# Altium PCB Sound_Sensor_PoE_v1.0.PcbDoc (part 4 of 4)
Units mil, origin at the board's own origin, x right, y up, seen from the top; angles counter-clockwise.
Board outline 3543.31 x 3543.31 mil, 2 copper layers (Top Layer, Bottom Layer), stack 57 mil thick; 149 components, 113 nets, 536 pads, 184 vias.
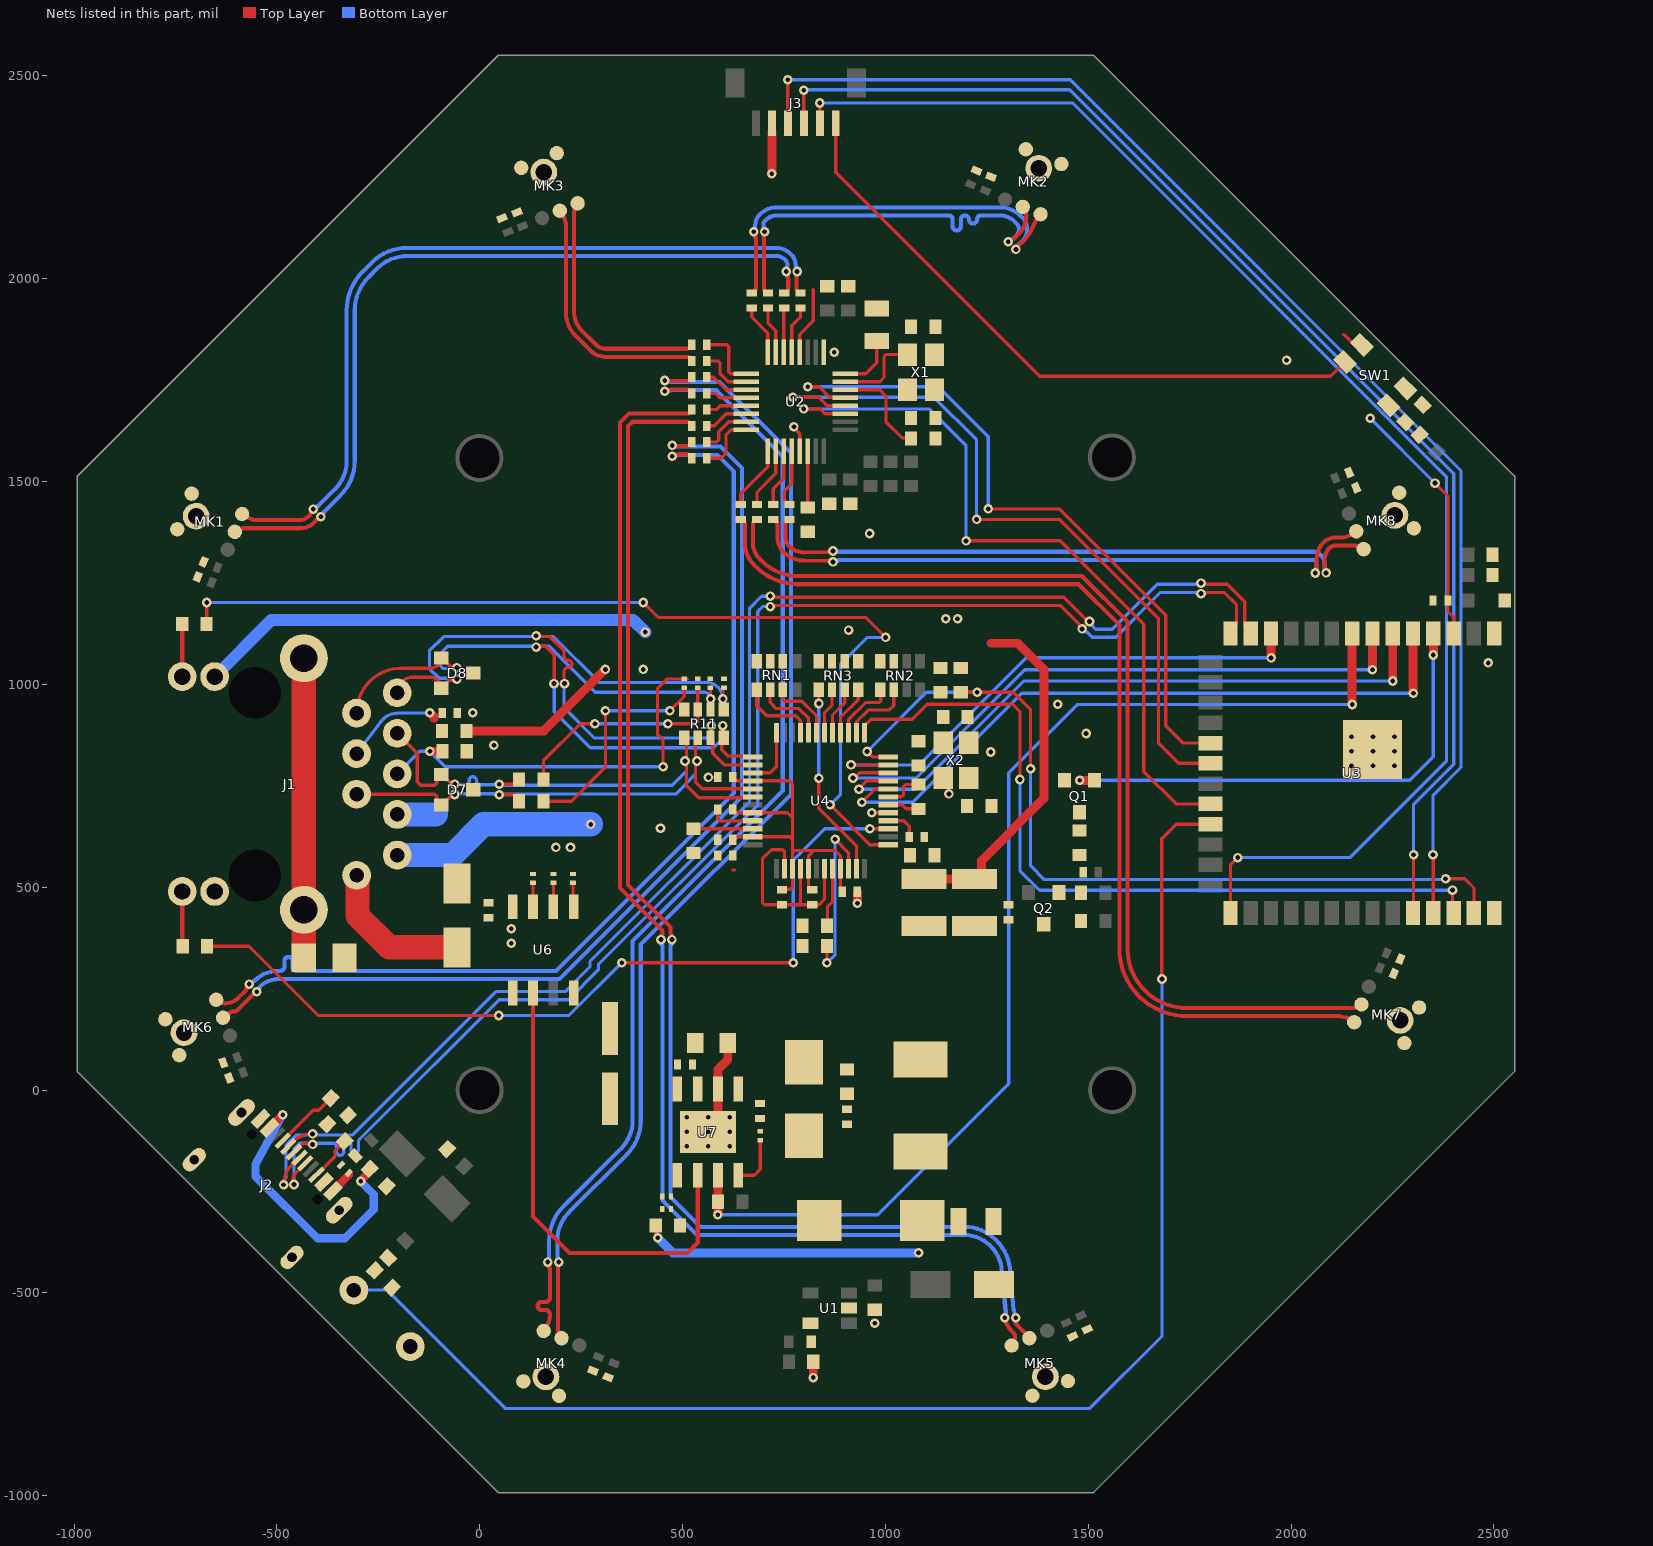
[diagram p2: the nets of this part, all layers, seen from the top]

## Via types
v1: diameter 23.62, hole 11.81, Top Layer to Bottom Layer, tented both sides, 155 vias
v2: diameter 23.62, hole 11.81, Top Layer to Bottom Layer, 29 vias

## Nets (pads, with @x,y where several pads share a name; then routed paths per layer and width w, separated by ;. In a path a pad name is that pad's centre, name@x,y a point inside that pad or via, vN(x,y) a via of type N, cw(c..) or ccw(c..) an arc to the next point about the centre after c; other vN are vias at no path point) (continued)
ACTLED: R14.2 U4.27 | length 2096.3
  Top Layer w8: R14.2@-671.89,354.86 -568.63,354.86 -397.77,184 v1(47,184) ; v1@342.65,314 v1(773,314) ; v1(961.99,644.27) U4.27@1007.48,644.27
  Bottom Layer w8: v1(47,184) 220,184 v1(350,314) ; v1(773,314) 773,567 850.27,644.27 v1(961.99,644.27)
ADC1_XIN: R6.1 U2.22 | length 249.3
  Top Layer w8: U2.22@901.19,1726.33 986,1726.33 1001.28,1711.05 1001.28,1647.46 1041.28,1607.46 1062.62,1607.46 R6.1@1063.59,1606.49
ADC1_XOUT#: C40.2 U2.23 X1.3 | length 211.1
  Top Layer w8: U2.23@901.19,1746.02 986,1746.02 996.59,1756.61 996.59,1808.42 1001.28,1813.1 X1.3@1054.18,1813.1
CAP: C42.2 U2.24 | length 142.2
  Top Layer w8: U2.24@901.19,1765.7 951.32,1765.7 978.59,1792.97 C42.2@978.59,1846.49
CT_R: C64.2 J1.5 R24.1 R25.1 | length 1007.1
  Top Layer w8: v1(452,797) 452,863.15 438.19,876.96 438.19,989.5 462.39,1013.7 R24.1@504.35,1013.7 511.64,1013.7
  Top Layer w22: v1(-122.74,835.38) C64.2@-91.77,835.38
  Bottom Layer w8: J1.5@-203.34,779.49 -147.45,835.38 -123,835.38 v1(-122.74,835.38) -84.35,797 v1(452,797)
CT_T: C63.2 J1.4 R17.1 | length 259.5
  Top Layer w22: v1@-123,929.49 -121.28,929.49 -112.99,921.2 -112.99,916.99
  Bottom Layer w8: J1.4@-303.34,845.15 J1.4@-303.34,829.49 -242.72,909.37 cw(c-203.34,879.49) -204.3,928.91 v1(-123,930.49)
DCDC_POK: R47.1 U3.8 U7.7 | length 2805.8
  Top Layer w22: v1(587,-307) 587.26,-306.74 587.26,-276.02 R47.1@588,-275.28 ; R47.1@587.52,-275.28 U7.7@587.52,-209.58 ; v1(2150.7,950.49) U3.8@2150.7,1125.17
  Bottom Layer w8: v1(587,-307) 981,-307 1304,16 1304,782 1472.49,950.49 v1(2150.7,950.49)
"DEBUG SIG.ENABLE": C48.2 C53.1 J3.6 R7.2 SW1.1 U3.3 | length 2215.5
  Top Layer w8: J3.6@877.7,2382.99 877.7,2262.3 1380.6,1759.4 2097.22,1759.4 SW1.1@2133.02,1795.2 ; v1(2354.92,1496.4) 2386.92,1464.4 C48.2@2386.92,1206.99 2386.92,1179.08 2400.7,1165.3 U3.3@2400.7,1125.17
  Bottom Layer w8: v1(2195,1656.31) v1(2354.92,1496.4)
"DEBUG SIG.IO_0": J3.5 U3.27 | length 3435.1
  Top Layer w8: J3.5@838.33,2382.99 v1(838.33,2433.33) ; U3.27@1850.7,436.2 1850.7,555.49 v1(1868.42,573.2)
  Bottom Layer w8: v1(838.33,2433.33) 1461.67,2433.33 2383,1512 2383,811 2145.2,573.2 v1(1868.42,573.2)
"DEBUG SIG.RX": J3.4 U3.36 | length 3201.1
  Top Layer w8: J3.4@798.96,2382.99 v1(798.96,2464.6) ; U3.36@2300.7,436.2 2302,437.5 v1(2302,580)
  Bottom Layer w8: v1(798.96,2464.6) 800.4,2466.04 1454.42,2466.04 2401,1519.46 2401,803.54 2302,704.54 v1(2302,580)
"DEBUG SIG.TX": J3.3 U3.37 | length 3285.5
  Top Layer w8: J3.3@759.59,2382.99 v1(759.59,2490.41) ; v1(2350,580) 2350.7,579.3 U3.37@2350.7,436.2
  Bottom Layer w8: v1(759.59,2490.41) 1455.5,2490.41 2419,1526.91 2419,796.09 2350,727.09 v1(2350,580)
FB: C72.1 R45.1 R46.2 U7.5
GND: C1.2 C2.2 C3.2 C4.2 C5.2 C6.2 C7.2 C8.2 C9.2 C10.2 C11.2 C12.2 C13.2 C14.2 C15.2 C16.2 C17.2 C18.2 C35.2 C36.2 C37.2 C38.2 C39.1 C40.1 C41.2 C42.1 C43.2 C44.2 C45.1 C46.2 C47.2 C48.1 C50.1 C51.1 C52.1 C53.2 C54.1 C55.1 C56.1 C57.1 C58.1 C59.1 C60.1 C63.1 C64.1 C65.1 C66.1 C67.1 C68.1 C70.2 C73.2 C74.1 C75.1 D1.1 D2.2 D4.1 D7.3 D8.3 J1.7 J2.A1/B12 J2.B1/A12 J2.S1 J2.S2 J2.S3 J2.S4 J3.2 MK1.2 MK1.3 MK1.4 MK2.2 MK2.3 MK2.4 MK3.2 MK3.3 MK3.4 MK4.2 MK4.3 MK4.4 MK5.2 MK5.3 MK5.4 MK6.2 MK6.3 MK6.4 MK7.2 MK7.3 MK7.4 MK8.2 MK8.3 MK8.4 Q1.2 R1.1 R2.1 R37.1 R40.1 R46.1 RN2.3 RN2.4 RN3.1 RN3.2 RN3.3 RN3.4 SW1.2 SW2.2 U1.2 U2.13 U2.25 U2.28 U3.1 U3.40 U3.41 U4.3 U4.9 U4.14 U4.16 U4.19 U4.29 U4.48 U6.5 U7.4 X1.2 X1.4 X2.2 X2.4 | length 1499.8
  Top Layer w8: v1@568.8,770.87 C54.1@586.4,770.87 ; C54.1@586.52,768.5 C54.1@586.69,768.68 ; C55.1@588.51,689.82 C55.1@586.69,691.64 586.69,669.96 593.31,663.34 672.22,663.34 U4.9@672.83,663.95 ; U4.3@672.83,782.06 715.92,782.06 731.89,798.03 U4.48@731.89,880.49 ; U4.14@751.57,545.84 751.57,587.61 746.89,592.3 719.29,592.3 696.85,569.86 696.85,462.17 702.18,456.84 C58.1@745.27,456.84 785.82,456.84 ; v1(774.47,1635.31) 774.47,1632.53 788.98,1618.02 U2.13@788.98,1574.76 ; U2.28@788.98,1818.85 788.98,1862.64 822.45,1896.1 822.45,1973.44 ; U4.16@790.94,545.84 790.94,461.97 785.82,456.84 ; U4.19@850,545.84 850,470.23 836.61,456.84 C59.1@819.63,456.84 785.82,456.84 ; v1@966.24,680.31 v1(966.24,683.64) U4.29@1007.48,683.64 ; X2.4@1132.92,759.78 X2.4@1142.57,769.43 ; v1(1989,1799) v1@1989,1800.07 ; 2129.54,1862.8 2155.38,1836.96 SW1.2@2174.78,1836.96
  Top Layer w20: J2.B1/A12@-361.79,-248.77 D1.1@-322.68,-209.65
  Top Layer w22: v1(720,2259) 720.11,2259.11 J3.2@720.11,2362.5 ; C2.2@822.06,-669.39 822.27,-669.61 822.27,-708.3 v1(822.49,-708.51) ; v1(931,460.88) C60.1@931,489
  Bottom Layer w8: v1(2486,1053) v1@2492,1053
  Bottom Layer w60: J1.7@-203.34,679.49 -108.51,679.49
  other v1: 974.06,-574.54 445.81,645.73 1156.69,730.19 563.8,770.87 2149,799.59 2202,799.59 2255,799.59 1260.02,833.52 2149,835.29 2202,835.29 2255,835.29 34.96,850 2149,871 2202,871 2255,871 -16.93,930.49 961,1372 874.09,1818.85
  other v2: 1494.78,879 1424.96,951.21
GPIO21: C45.2 R8.1 SW2.1 U3.23 | length 3548.8
  Top Layer w8: v1(1682,274) 1681,275 1681,619.98 1716.51,655.49 U3.23@1801.49,655.49
  Bottom Layer w8: SW2.1@-310.11,-492.92 -228.08,-492.92 64,-785 1503,-785 1682,-606 v1(1682,274)
LINKLED: R13.2 U4.25 | length 2442.3
  Top Layer w8: R13.2@-673.26,1149 -673,1149.26 v1(-673,1202) ; v1(403,1202) 440,1165 951.31,1165 1000.31,1116 v1(1000.49,1116) ; v1(863.72,703.66) 863.72,702.98 961.81,604.9 U4.25@1007.48,604.9
  Bottom Layer w8: v1(-673,1202) v1(403,1202) ; v1(863.72,703.66) 889.54,729.48 889.54,1049.54 956,1116 v1(1000.49,1116)
MIC_OUTS.OUT1_N: C32.1 MK1.6 | length 1988.2
  Top Layer w10: MK1.6@-603.43,1376.2 -602.77,1376.2 ccw(c-602.77,1391.25) -592.14,1380.61 cw(c-581.5,1369.97) -581.5,1385.02 -442.13,1385.02 ccw(c-442.13,1433.29) -408,1399.16 -400.61,1406.55 cw(c-393.57,1399.44) -398.13,1408.34 ccw(c-410.25,1432.26) v1(-391.3,1413.3) ; C32.1@750.59,1964.99 ccw(c750.59,1973.44) 756.57,1967.46 ccw(c746.85,1977.18) 760.59,1977.18 760.59,1999.48 ccw(c750.59,1999.48) 759.26,2004.46 cw(c782.4,2018) v1(755.59,2018)
  Bottom Layer w10: v1(-391.3,1413.3) ccw(c-410.25,1432.26) -385.61,1421.71 cw(c-376.44,1417.72) -383.84,1424.43 ccw(c-384.81,1425.4) -383.44,1425.4 cw(c-382.08,1425.4) -383.05,1426.36 -343.11,1466.3 ccw(c-427.86,1551.06) -308,1551.06 -308,1921.58 cw(c-191.79,1921.58) -273.96,2003.75 -251.46,2026.25 cw(c-179.64,1954.43) -179.64,2056 730.01,2056 cw(c730.01,2022.72) 753.54,2046.25 cw(c740.36,2033.08) 758.6,2036.89 cw(c748.81,2034.84) 758.63,2032.94 758.04,2029.82 cw(c748.21,2031.63) 757.53,2028.01 ccw(c782.4,2018) v1(755.59,2018)
MIC_OUTS.OUT1_P: C31.1 MK1.1 | length 2003.3
  Top Layer w10: MK1.1@-585.67,1420.16 cw(c-585.67,1411.86) -579.8,1417.72 ccw(c-549.12,1448.4) -549.12,1405.02 -446.27,1405.02 ccw(c-446.27,1443.29) -419.21,1416.23 ccw(c-426.91,1422.61) -417.25,1420.03 cw(c-391.3,1413.3) v1(-410.25,1432.26) ; v1(782.4,2018) cw(c755.59,2018) 781.07,2009.66 ccw(c790.59,2006.6) 780.59,2006.64 780.59,1977.18 ccw(c794.33,1977.18) 784.62,1967.46 ccw(c790.59,1973.44) C31.1@790.59,1964.99
  Bottom Layer w10: v1(-410.25,1432.26) cw(c-391.3,1413.3) -401.82,1437.96 ccw(c-405.83,1447.12) -399.12,1439.7 ; -399.12,1439.71 cw(c-398.15,1438.74) -398.15,1440.11 ccw(c-398.15,1441.47) -397.19,1440.51 -357.29,1480.4 ccw(c-428,1551.12) -328,1551.12 -328,1921.63 cw(c-191.92,1921.63) -288.14,2017.86 -265.49,2040.51 cw(c-179.81,1954.84) -179.81,2076 730.08,2076 cw(c730.08,2022.91) 767.62,2060.45 767.75,2060.32 cw(c740.61,2033.18) 779,2033.18 779,2033.08 ccw(c780.36,2033.08) 779.4,2032.11 cw(c778.43,2031.15) 779.79,2031.15 ccw(c789.78,2031.63) 780.47,2027.99 cw(c755.59,2018) v1(782.4,2018)
MIC_OUTS.OUT2_N: C33.1 MK2.6 | length 1060.1
  Top Layer w10: v1(702.4,2116) cw(c675.59,2116) 701.07,2107.66 ccw(c710.59,2104.6) 700.59,2104.64 700.59,1977.18 ccw(c714.33,1977.18) 704.62,1967.46 ccw(c710.59,1973.44) C33.1@710.59,1964.99 ; v1(1302.75,2091.26) cw(c1321.7,2072.3) 1314.93,2098.24 ccw(c1312.31,2107.89) 1319.34,2100.78 1328.6,2110.04 ccw(c1283.16,2155.48) 1347.42,2155.48 ccw(c1332.64,2155.48) 1343.09,2165.93 cw(c1353.54,2176.38) 1338.76,2176.38 MK2.6@1338.76,2177.14
  Bottom Layer w10: v1(702.4,2116) ccw(c675.59,2116) 700.47,2126 cw(c709.78,2129.63) 699.95,2127.83 699.35,2130.98 cw(c709.18,2132.84) 699.38,2134.85 cw(c717.63,2131.08) 704.45,2144.25 cw(c732.81,2115.89) 732.81,2156 1131,2156 1156,2156 cw(c1156,2146) 1166,2146 1166,2128.96 ccw(c1176,2128.96) 1186,2128.96 1186,2146 cw(c1196,2146) 1206,2146 ccw(c1216,2146) 1226,2146 cw(c1236,2146) 1236,2156 1270.52,2156 1281.37,2156 cw(c1281.37,2101.37) 1320,2140 1323.48,2136.52 cw(c1308.8,2121.85) 1329.56,2121.85 cw(c1308.8,2121.85) 1325.99,2110.21 cw(c1308.8,2121.85) 1323.48,2107.18 1315.81,2099.51 cw(c1314.85,2100.47) 1314.85,2099.11 ccw(c1314.85,2097.74) 1314.16,2098.92 ccw(c1314.85,2097.74) 1313.88,2098.71 ; v1(1302.75,2091.26) cw(c1321.7,2072.3) 1311.18,2096.96 ccw(c1307.17,2106.12) 1313.88,2098.7
MIC_OUTS.OUT2_P: C34.1 MK2.1 | length 1060.1
  Top Layer w10: C34.1@670.59,1964.99 ccw(c670.59,1973.44) 676.57,1967.46 ccw(c666.85,1977.18) 680.59,1977.18 680.59,2097.52 ccw(c670.59,2097.48) 679.26,2102.47 cw(c702.4,2116) v1(675.59,2116) ; v1(1321.7,2072.3) ccw(c1302.75,2091.26) 1326.66,2079.14 cw(c1335.56,2074.57) 1328.45,2081.61 1342.81,2095.96 ccw(c1283.16,2155.48) 1358.9,2118.55 1369.84,2141 cw(c1391.38,2130.5) 1374.44,2147.44 1379.67,2152.67 ccw(c1372.58,2159.73) MK2.1@1382.56,2159
  Bottom Layer w10: v1(675.59,2116) cw(c702.4,2116) 677.51,2125.97 ccw(c668.21,2129.63) 678.2,2129.15 cw(c679.56,2129.15) 678.6,2130.11 ccw(c677.63,2131.08) 679,2131.08 679,2131.15 cw(c717.44,2131.15) 690.26,2158.34 690.37,2158.45 cw(c732.74,2116.08) 732.74,2176 1281.47,2176 cw(c1281.47,2101.6) 1334.08,2154.21 1337.69,2150.59 cw(c1309.04,2121.95) 1349.56,2121.95 1349.56,2121.75 cw(c1309.04,2121.75) 1337.69,2093.1 1329.96,2085.37 ccw(c1330.92,2084.4) 1329.56,2084.4 cw(c1328.19,2084.4) 1329.37,2083.72 cw(c1328.19,2084.4) 1329.16,2083.44 ccw(c1336.56,2076.72) 1327.4,2080.72 cw(c1302.75,2091.26) v1(1321.7,2072.3)
MIC_OUTS.OUT3_N: C20.1 MK3.6 | length 629.5
  Top Layer w10: MK3.6@197.6,2167.74 ccw(c205.9,2167.74) 200.03,2161.87 cw(c169.36,2131.2) 212.73,2131.2 212.73,1916.09 ccw(c291.98,1916.09) 235.95,1860.05 274.1,1821.9 ccw(c308.9,1856.71) 308.9,1807.49 510.4,1807.49 cw(c510.4,1793.75) 520.12,1803.46 cw(c514.14,1797.49) C20.1@522.59,1797.49
MIC_OUTS.OUT3_P: C19.1 MK3.1 | length 614.4
  Top Layer w10: MK3.1@241.39,2185.88 241.39,2185.12 cw(c226.61,2185.12) 237.06,2174.67 ccw(c247.51,2164.22) 232.73,2164.22 232.73,1916.17 ccw(c292.17,1916.17) 250.14,1874.14 288.17,1836.12 ccw(c309,1856.95) 309,1827.49 510.4,1827.49 ccw(c510.4,1841.23) 520.12,1831.51 ccw(c514.14,1837.49) C19.1@522.59,1837.49
MIC_OUTS.OUT4_N: C21.1 MK4.6 | length 2870.2
  Top Layer w10: v1(194.77,-424) cw(c167.96,-424) 193.44,-432.34 ccw(c202.96,-435.4) 192.96,-435.36 192.96,-589.5 ccw(c208,-589.5) 197.36,-600.14 cw(c186.73,-610.77) 201.77,-610.77 MK4.6@201.77,-611.43 ; v1(456,1749.3) cw(c456,1722.49) 464.34,1747.97 ccw(c467.4,1757.49) 467.36,1747.49 510.4,1747.49 ccw(c510.4,1761.23) 520.12,1751.51 ccw(c514.14,1757.49) C21.1@522.59,1757.49
  Bottom Layer w10: v1(194.77,-424) ccw(c167.96,-424) 192.82,-413.98 cw(c202.15,-410.37) 192.16,-410.87 ccw(c190.8,-410.85) 191.76,-409.89 cw(c192.73,-408.92) 191.36,-408.92 191.36,-371.06 cw(c291.36,-371.06) 220.65,-300.35 362.62,-158.38 ccw(c279.64,-75.39) 397,-75.39 397,358.92 767,728.92 767,1531.12 767,1570.28 591.39,1745.89 471.08,1745.89 cw(c471.08,1747.26) 470.11,1746.29 ccw(c469.15,1745.33) 469.15,1746.69 cw(c469.63,1756.68) 465.99,1747.37 ccw(c456,1722.49) v1(456,1749.3)
MIC_OUTS.OUT4_P: C22.1 MK4.1 | length 2864.8
  Top Layer w10: MK4.1@157.82,-593.67 cw(c166.12,-593.67) 160.25,-587.8 ccw(c129.58,-557.12) 172.96,-557.12 172.96,-552.12 ccw(c162.96,-552.12) 162.96,-542.12 152.96,-542.12 cw(c152.96,-532.12) 152.96,-522.12 162.96,-522.12 ccw(c162.96,-512.12) 172.96,-512.12 172.96,-454.24 172.96,-442.48 ccw(c162.96,-442.52) 171.62,-437.53 cw(c194.77,-424) v1(167.96,-424) ; v1(456,1722.49) ccw(c456,1749.3) 469.52,1726.15 cw(c474.52,1717.49) 474.48,1727.49 510.4,1727.49 cw(c510.4,1713.75) 520.12,1723.46 cw(c514.14,1717.49) C22.1@522.59,1717.49
  Bottom Layer w10: v1(167.96,-424) cw(c194.77,-424) 169.88,-414.03 ccw(c160.58,-410.37) 170.56,-410.85 cw(c171.93,-410.85) 170.96,-409.89 ccw(c170,-408.92) 171.36,-408.92 171.36,-371 cw(c291.23,-371) 206.47,-286.25 347.71,-145.01 ccw(c277,-74.29) 377,-74.29 377,367.2 747,737.2 747,1562 583.11,1725.89 479.53,1725.89 463.89,1723.66 463.05,1723.43 cw(c456,1749.3) v1(456,1722.49)
MIC_OUTS.OUT5_N: C24.1 MK5.6 | length 3233.6
  Top Layer w10: v2(473.81,371) 473.81,382.11 470.16,385.75 470.16,401.84 453,419 366,506 366,1637.38 376.11,1647.49 510.4,1647.49 cw(c510.4,1633.75) 520.12,1643.46 cw(c514.14,1637.49) C24.1@522.59,1637.49 ; v1(1321.17,-560.91) cw(c1294.36,-560.91) 1320.74,-565.7 ccw(c1330.59,-567.43) 1320.59,-567.39 1320.59,-569.31 ccw(c1334.57,-569.31) 1324.71,-579.22 1352.4,-606.91 cw(c1345.35,-614) MK5.6@1355,-611.37
  Bottom Layer w10: v2(473.81,371) 473.81,359.89 470.41,356.49 470.41,-263.41 544,-337 1194.48,-337 cw(c1194.48,-447.58) 1272.67,-369.39 1273.22,-369.93 cw(c1189.24,-453.91) 1307.94,-450.14 ; 1306.72,-436.82 1307.94,-450.14 ; v1(1321.17,-560.91) ccw(c1294.36,-560.91) 1318.8,-549.87 cw(c1327.94,-545.82) 1318.38,-548.77 1316.77,-543.44 cw(c1326.35,-540.57) 1316.75,-543.36 1316.63,-542.96 cw(c1326.26,-540.24) 1316.3,-541.17 1309.94,-471.92 1307.94,-450.14
MIC_OUTS.OUT5_P: C23.1 MK5.1 | length 3269.4
  Top Layer w10: v2(447,371) 447,382.11 450.16,385.27 450.16,393.55 346,497.72 346,1645.67 367.82,1667.49 510.4,1667.49 ccw(c510.4,1681.23) 520.12,1671.51 ccw(c514.14,1677.49) C23.1@522.59,1677.49 ; v1(1294.36,-560.91) ccw(c1321.17,-560.91) 1298.18,-574.7 1305.43,-586.79 ccw(c1334.57,-569.31) 1310.54,-593.34 1315.8,-598.59 cw(c1306.2,-608.31) 1315.86,-617.97 1315.53,-618.3 ccw(c1325.98,-628.75) 1311.21,-628.75 MK5.1@1311.21,-629.51
  Bottom Layer w10: v2(447,371) 447,359.89 450.41,356.49 450.41,-271.69 535.71,-357 1194.36,-357 cw(c1194.36,-447.86) 1258.61,-383.61 1259,-384 cw(c1188.99,-454.01) 1286.8,-438.65 1287.96,-451.3 1296.73,-546.8 cw(c1286.78,-547.79) 1296.13,-551.33 ccw(c1321.17,-560.91) v1(1294.36,-560.91)
MIC_OUTS.OUT6_N: C25.1 MK6.6 | length 2559.4
  Top Layer w10: MK6.6@-632.56,178.56 ccw(c-632.56,186.84) -626.7,180.99 -618.76,188.92 cw(c-607.22,177.37) -607.22,193.7 ccw(c-607.22,210.03) -595.67,198.49 -558.61,235.55 cw(c-551.57,228.44) -556.13,237.34 ccw(c-568.25,261.26) v1(-549.3,242.3) ; v1(474.52,1589.3) cw(c474.52,1562.49) 482.87,1587.97 ccw(c485.93,1597.49) 485.88,1587.49 510.4,1587.49 ccw(c510.4,1601.23) 520.12,1591.51 ccw(c514.14,1597.49) C25.1@522.59,1597.49
  Bottom Layer w10: v1(-549.3,242.3) -543.6,248 -543.6,250.73 cw(c-534.44,246.72) -541.85,253.43 ccw(c-542.81,254.4) -541.44,254.4 cw(c-540.08,254.4) -541.04,255.37 cw(c-496.27,210.59) -496.27,273.91 -418.84,273.91 196.46,273.91 646.31,723.77 646.31,1533.7 599.98,1580.03 593.98,1586.04 568.13,1586.04 488.04,1586.68 cw(c488.17,1596.68) 484.5,1587.37 ccw(c474.52,1562.49) v1(474.52,1589.3)
MIC_OUTS.OUT6_P: C26.1 MK6.1 | length 2557.9
  Top Layer w10: MK6.1@-649.54,222.81 -649.1,222.81 cw(c-649.1,207.26) -638.11,218.26 ccw(c-627.11,229.25) -627.11,213.7 ccw(c-627.11,258.06) -595.74,226.69 -577.8,244.64 ccw(c-584.89,251.69) -575.24,249.07 cw(c-549.3,242.3) v1(-568.25,261.26) ; v1(474.52,1562.49) ccw(c474.52,1589.3) 488.05,1566.15 cw(c493.05,1557.49) 493,1567.49 510.4,1567.49 cw(c510.4,1553.75) 520.12,1563.46 cw(c514.14,1557.49) C26.1@522.59,1557.49
  Bottom Layer w10: v1(-568.25,261.26) cw(c-549.3,242.3) -559.85,266.95 ccw(c-563.83,276.12) -557.12,268.71 cw(c-556.15,267.74) -556.15,269.11 ccw(c-556.15,270.47) -555.19,269.51 -555.08,269.61 cw(c-496.41,210.94) -496.41,293.91 -491.41,293.91 ccw(c-491.41,303.91) -481.41,303.91 -481.41,318.4 cw(c-471.41,318.4) -461.41,318.4 -461.41,303.91 ccw(c-451.41,303.91) -451.41,293.91 -418.84,293.91 188.17,293.91 626.31,732.05 626.31,1525.42 585.84,1565.89 488.15,1565.11 ccw(c488.17,1555.11) 484.51,1564.42 cw(c474.52,1589.3) v1(474.52,1562.49)
MIC_OUTS.OUT7_N: C28.1 MK7.6 | length 2540.2
  Top Layer w10: C28.1@683.59,1406.49 ccw(c683.59,1398.04) 677.62,1404.01 ccw(c687.33,1394.3) 673.59,1394.3 673.59,1349.1 ccw(c729.62,1349.1) 689.64,1309.84 690.77,1308.63 ccw(c785.8,1396.27) 785.8,1267 1476,1267 cw(c1476,1146) 1484.59,1266.69 1596.69,1154.59 cw(c1476,1146) 1597,1146 1597,348.56 ccw(c1743,348.56) 1743,202.56 2151.99,202.56 ccw(c2151.99,217.33) 2162.44,206.88 cw(c2172.89,196.43) 2172.89,211.21 MK7.6@2173.65,211.21
MIC_OUTS.OUT7_P: C27.1 MK7.1 | length 2553.3
  Top Layer w10: C27.1@643.59,1406.49 cw(c643.59,1398.04) 649.57,1404.01 cw(c639.85,1394.3) 653.59,1394.3 653.59,1349 ccw(c729.56,1349) 675.51,1295.61 675.72,1295.4 cw(c668.62,1288.36) 675.84,1295.27 677.93,1293.09 ccw(c785.8,1396.27) 776.53,1247.29 777.36,1247.24 777.76,1247.21 ccw(c785.75,1396.26) 785.55,1247 1476,1247 1577,1146 1577,348.56 ccw(c1743,348.56) 1743,182.56 2118.97,182.56 2134.96,179.5 cw(c2118.97,139.18) 2138.81,177.75 MK7.1@2155.51,167.42
MIC_OUTS.OUT8_N: C29.1 MK8.6 | length 1607.8
  Top Layer w10: C29.1@723.59,1406.49 cw(c723.59,1398.04) 729.57,1404.01 730.34,1403.24 cw(c722.49,1395.39) 733.59,1395.39 733.59,1364.02 ccw(c787.43,1364.02) 749.36,1325.95 749.54,1325.77 ccw(c798.37,1374.61) 798.37,1305.54 800.54,1305.54 857.37,1304.78 cw(c857.33,1294.78) 861,1304.08 ccw(c871,1328.95) v1(871,1302.14) ; v1(2059.67,1274.77) cw(c2086.47,1275.08) 2062.98,1288 2062.98,1308.87 cw(c2121,1308.87) 2079.98,1349.89 2080.09,1350.01 cw(c2109.58,1320.53) 2109.58,1362.22 2124.25,1362.22 ccw(c2124.25,1405.6) 2154.92,1374.93 cw(c2160.79,1369.06) MK8.6@2160.79,1377.36
  Bottom Layer w10: v1(871,1302.14) ccw(c871,1328.95) 884.52,1305.8 cw(c889.52,1297.14) 889.48,1307.14 2056.14,1307.14 cw(c2056.14,1304.71) 2057.86,1306.43 2060.08,1304.21 cw(c2053.01,1297.14) 2063.01,1297.14 2063.01,1288.48 ; v1(2059.67,1274.77) cw(c2086.47,1275.08) 2062,1286.02 2062.59,1287.36 ccw(c2053.44,1291.4) 2063,1288.44
MIC_OUTS.OUT8_P: C30.1 MK8.1 | length 1591.6
  Top Layer w10: C30.1@763.59,1406.49 ccw(c763.59,1398.04) 757.62,1404.01 756.84,1403.24 ccw(c764.69,1395.39) 753.59,1395.39 753.59,1364.14 ccw(c787.73,1364.14) 763.59,1340 ccw(c798.47,1374.88) 798.47,1325.55 800.27,1325.55 857.52,1326.32 ccw(c857.33,1336.32) 861,1327.02 cw(c871,1302.14) v1(871,1328.95) ; v1(2086.47,1275.08) v1(2086.47,1275.08) ccw(c2059.67,1274.77) 2082.98,1288 2082.98,1308.81 cw(c2121.14,1308.81) 2094.16,1335.79 cw(c2109.68,1320.27) 2109.68,1342.22 2157.27,1342.22 cw(c2157.27,1327.45) 2167.72,1337.9 ccw(c2178.17,1348.35) 2178.17,1333.57 MK8.1@2178.93,1333.57
  Bottom Layer w10: v1(871,1328.95) cw(c871,1302.14) 879.34,1327.62 ccw(c882.4,1337.14) 882.36,1327.14 2056.23,1327.14 cw(c2056.23,1304.92) 2071.94,1320.63 2074.27,1318.31 cw(c2053.17,1297.21) 2083.01,1297.21 2083.01,1288.38 ccw(c2084.55,1288.38) 2083.46,1287.29 2084.23,1285.51 cw(c2059.67,1274.77) v1(2086.47,1275.08) v1(2086.47,1275.08)
MISO: U2.20 U3.20 | length 1835.8
  Top Layer w8: v1(772,1708) 835.81,1708 856.85,1686.96 U2.20@901.19,1686.96 ; v1(1224.81,1406.81) 1429.1,1406.81 1673,1162.91 1673,856 1723.51,805.49 U3.20@1801.49,805.49
  Bottom Layer w8: v1(772,1708) 1119.62,1708 1224.81,1602.81 v1(1224.81,1406.81)
MOSI: U2.21 U3.19 | length 1723.8
  Top Layer w8: v1(808.67,1733.81) 836.62,1733.81 863.3,1707.13 900.7,1707.13 U2.21@901.19,1706.65 ; v1(1253.54,1432.62) 1428.75,1432.62 1691,1170.37 1691,898.72 1734.23,855.49 U3.19@1801.49,855.49
  Bottom Layer w8: v1(808.67,1733.81) 1130.32,1733.81 1253.54,1610.59 v1(1253.54,1432.62)
NetC19_2: C19.2 U2.1 | length 163.8
  Top Layer w8: C19.2@559.59,1837.49 609.31,1837.49 614,1832.8 614,1770.39 618.69,1765.7 U2.1@657.09,1765.7
NetC20_2: C20.2 U2.2 | length 134
  Top Layer w8: C20.2@559.59,1797.49 587.4,1797.49 592.09,1792.8 592.09,1766.85 612.92,1746.02 U2.2@657.09,1746.02
NetC21_2: C21.2 U2.3 | length 118
  Top Layer w8: C21.2@564.59,1751.92 559.59,1756.92 C21.2@559.59,1757.49 575.99,1757.49 607.14,1726.33 U2.3@657.09,1726.33
NetC22_2: C22.2 U2.4 | length 102
  Top Layer w8: C22.2@559.59,1717.49 581.24,1717.49 592.09,1706.65 U2.4@657.09,1706.65
NetC23_2: C23.2 U2.5 | length 101.4
  Top Layer w8: C23.2@559.59,1677.49 583.2,1677.49 592.67,1686.96 U2.5@657.09,1686.96
NetC24_2: C24.2 U2.6 | length 109.8
  Top Layer w8: C24.2@559.59,1637.49 578.19,1637.49 607.98,1667.28 U2.6@657.09,1667.28
NetC25_2: C25.2 U2.7 | length 129.7
  Top Layer w8: C25.2@559.59,1597.49 583.2,1597.49 589.14,1603.43 589.14,1622.99 613.75,1647.59 U2.7@657.09,1647.59
NetC26_2: C26.2 U2.8 | length 153.4
  Top Layer w8: C26.2@559.59,1557.49 594.64,1557.49 607.14,1569.99 607.14,1615.53 619.52,1627.91 U2.8@657.09,1627.91
NetC27_2: C27.2 U2.9 | length 158.9
  Top Layer w8: C27.2@643.59,1443.49 643.59,1469.96 710.13,1536.5 710.13,1574.64 U2.9@710.24,1574.76
NetC28_2: C28.2 U2.10 | length 150.5
  Top Layer w8: C28.2@683.59,1443.49 683.59,1473.96 729.93,1520.3 U2.10@729.93,1574.76
NetC29_2: C29.2 U2.11 | length 142
  Top Layer w8: C29.2@723.59,1443.49 723.59,1482.46 749.61,1508.49 U2.11@749.61,1574.76
NetC30_2: C30.2 U2.12 | length 146
  Top Layer w8: C30.2@763.59,1443.49 760.09,1443.49 755.09,1448.49 755.09,1451.99 751.09,1455.99 751.09,1476.5 769.3,1494.71 U2.12@769.3,1574.76
NetC31_2: C31.2 U2.29 | length 118
  Top Layer w8: U2.29@769.3,1818.85 769.3,1884 790.59,1905.29 C31.2@790.59,1927.99
NetC32_2: C32.2 U2.30 | length 109.6
  Top Layer w8: C32.2@748.59,1927.99 749.61,1926.96 U2.30@749.61,1818.85
NetC33_2: C33.2 U2.31 | length 117.1
  Top Layer w8: C33.2@710.59,1927.99 710.59,1891.15 729.93,1871.81 U2.31@729.93,1818.85
NetC34_2: C34.2 U2.32 | length 125.6
  Top Layer w8: C34.2@670.59,1927.99 670.59,1905.69 710.24,1866.04 U2.32@710.24,1818.85
NetC39_2: C39.2 R6.2 X1.1
NetC49_1: C49.1 Q2.1 R9.1 R10.1
NetC50_2: C50.2 FB3.1 Q2.3 R12.1
NetC61_2: C61.2 R11.3 R25.2 | length 549.6
  Top Layer w8: C61.2@157,765.5 157,811.54 248.46,903 v1(284,903) ; v1(464,903) 530.93,903 537.42,909.5 R25.2@537.42,992.05
  Bottom Layer w8: v1(284,903) v1(464,903)
NetC62_2: C62.2 R11.4 R24.2 | length 557.7
  Top Layer w8: C62.2@157,711.96 226.31,711.96 310,795.64 v2(310,935) ; v1(469,935) 504.35,970.35 R24.2@504.35,992.05
  Bottom Layer w8: v2(310,935) v1(469,935)
NetC65_2: C65.2 U4.22 | length 439.7
  Top Layer w8: v1(856,314) C65.2@856,355 ; v1(875.98,618.28) 909.05,585.23 U4.22@909.05,545.84
  Bottom Layer w8: v1(856,314) 875.98,333.98 v1(875.98,618.28)
NetC66_2: C66.2 U4.20 | length 146
  Top Layer w8: C66.2@857.25,405 857.25,452.02 869.68,464.46 U4.20@869.68,545.84
NetC67_2: C67.2 R29.1 U4.30 X2.1 | length 76.5
  Top Layer w8: U4.30@1007.48,703.32 1041.27,703.32 1051.22,693.38 1071.33,693.38 R29.1@1077.33,687.38
NetC68_2: C68.2 R30.1 X2.3
NetC69_1: C69.1 D4.2 L1.1 R44.2 U7.1
NetC69_2: C69.2 R38.1
NetC72_2: C72.2 C73.1 F1.1 L1.2 R45.2 | length 686.3
  Top Layer w8: C72.2@435.48,-337.5 435.48,-360.48 v1(439,-364)
  Bottom Layer w22: v1(439,-364) 476,-401 v1(1082,-401)
NetC74_2: C74.2 R44.1
NetC75_2: "J1.Shield 1" "J1.Shield 2" C75.2 | length 733
  Top Layer w60: C75.2@-433.26,331.49 -433.26,444.45 -433.26,1064.53
NetFB2_1: FB2.1 U1.5
NetJ1_12: J1.12 R13.1 | length 129.7
  Top Layer w12: J1.12@-733.26,1019.25 R13.1@-733.26,1149
NetJ1_14: J1.14 R14.1 | length 137.4
  Top Layer w8: R14.1@-733.26,357.62 -730.51,354.86 R14.1@-730.51,353.49
  Top Layer w12: R14.1@-733.26,357.62 J1.14@-733.26,489.72
NetJ2_A5: J2.A5 R1.2 | length 162.2
  Top Layer w8: J2.A5@-485.67,-124.88 -410.38,-49.59 -397.12,-49.59 R1.2@-367.06,-19.54
NetJ2_B5: J2.B5 R2.2 | length 111.1
  Top Layer w8: J2.B5@-402.16,-208.4 -356.46,-162.7 -356.46,-149.46 R2.2@-332.99,-125.99
NetQ1_3: Q1.3 R9.2
NetR29_2: R29.2 R30.2 U4.31 | length 98.2
  Top Layer w8: U4.31@1007.48,723.01 1039.8,723.01 1044.49,727.69 1044.49,747.76 1050.11,753.38 R29.2@1081.33,753.38
NetR37_2: R37.2 U4.10 | length 135.4
  Top Layer w8: R37.2@537.42,644.27 U4.10@672.83,644.27
NetR38_2: R38.2 U7.8 | length 126.8
  Top Layer w8: U7.8@637.52,-209.58 677.42,-209.58 691.49,-195.51 691.49,-128.52
NetR39_1: R39.1 U6.3 | length 59.9
  Top Layer w8: R39.1@130.2,511.17 131.49,509.89 U6.3@131.49,451.79
NetR41_1: R41.1 U7.2 U7.9 | length 197.9
  Top Layer w22: U7.9@587.52,-67.1 U7.2@587.52,3.02 587.52,51.21 611.52,75.21 R41.1@611.52,116.02 R41.1@608.09,112.59
  other v1: 510.49,-138.51 563.49,-138.51 616.49,-138.51 510.49,-102.81 563.49,-102.81 616.49,-102.81 510.49,-67.1 563.49,-67.1 616.49,-67.1
NetR42_2: R42.2 U6.1 | length 59.9
  Top Layer w8: R42.2@230.2,511.17 230.2,453.07 U6.1@231.49,451.79
NetR43_2: R43.2 U6.2 | length 59.7
  Top Layer w8: U6.2@181.49,451.79 181.85,452.15 181.85,510.81 R43.2@182.2,511.17
NetRN1_1: RN1.1 U4.45 | length 193.7
  Top Layer w8: RN1.1@682.85,987.35 682.85,947.13 707.35,922.63 779.12,922.63 790.46,911.29 790.46,880.97 U4.45@790.94,880.49
NetRN1_2: RN1.2 U4.44 | length 178.7
  Top Layer w8: RN1.2@715.92,987.35 715.92,955.65 730.94,940.63 786.57,940.63 810.63,916.57 U4.44@810.63,880.49
NetRN1_3: RN1.3 U4.43 | length 167.8
  Top Layer w8: RN1.3@747.42,987.35 RN1.3@752.51,982.26 ; RN1.3@747.51,982.26 747.51,963.32 752.19,958.63 794.03,958.63 830.31,922.34 U4.43@830.31,880.49
NetRN2_5: RN2.5 U4.39 | length 159
  Top Layer w8: U4.39@909.05,880.49 909.05,913.18 951.08,955.21 983.77,955.21 988.45,959.9 988.45,986.39 RN2.5@987.69,987.15
NetRN2_6: RN2.6 U4.38 | length 178.2
  Top Layer w8: U4.38@928.74,880.49 U4.38@928.74,898.2 ; U4.38@931.04,900.5 U4.38@928.74,898.2 ; RN2.6@1020.76,987.15 1020.76,948.02 1009.96,937.21 958.54,937.21 928.74,907.41 U4.38@928.74,898.2
NetRN3_5: RN3.5 U4.23 | length 480.2
  Top Layer w8: RN3.5@834.49,987.03 836.08,985.44 v1(836.08,953.08) ; v1(836.08,768.68) 836.08,694.8 928.74,602.14 U4.23@928.74,545.84
  Bottom Layer w8: v1(836.08,768.68) v1(836.08,953.08)
NetRN3_6: RN3.6 U4.42 | length 114.3
  Top Layer w8: U4.42@850,880.49 850,922.74 850,930.5 868.43,948.93 RN3.6@868.43,987.15
NetRN3_7: RN3.7 U4.41 | length 119.2
  Top Layer w8: U4.41@869.68,880.49 869.68,924.73 899.93,954.97 RN3.7@899.93,987.15
NetRN3_8: RN3.8 U4.40 | length 137.2
  Top Layer w8: U4.40@889.37,880.49 889.37,918.96 933,962.59 RN3.8@933,987.15 RN3.8@924.2,978.35
NetU6_6: U6.6 U7.6 | length 1170.3
  Top Layer w10: U6.6@131.49,239.19 131.49,-311.49 221,-401 512,-401 537.52,-375.48 U7.6@537.52,-209.58
POE_5V: D6.2 F1.2
POE_PWR_N: C71.1 D3.2 J1.10 R42.1 R43.1 U6.4 | length 378.3
  Top Layer w60: J1.10@-303.34,529.49 -301.26,527.41 -301.26,430.26 -223.01,352.01 D3.2@-55.51,352.01
  other v1: 78,362 78,398 187.92,598.27 223.92,598.27
POE_PWR_P: C70.1 C71.2 D3.1 J1.9 R39.2 R40.2 R41.2 U6.8 U7.3 | length 508.6
  Bottom Layer w60: J1.9@-203.34,579.49 -66.51,579.49 9,655 v1(274,655)
RD_N: C62.1 D7.2 J1.6 R11.6 U4.5 | length 1238.2
  Top Layer w8: J1.6@-303.34,729.49 -110.73,729.49 -106.05,724.8 -106.05,714.25 D7.2@-94.88,703.09 ; D7.2@-92.91,703.09 -70.31,725.69 -64.26,725.69 v1(-61.27,728.68) ; v1(47.98,728.02) 83.44,728.02 97,714.46 C62.1@97,711.96 ; v2(535.7,811.3) v2@531.89,811.3 ; R11.6@537.42,868.49 531.89,862.95 v2@531.89,811.3 ; U4.5@672.83,742.69 548.84,742.69 531.89,759.64 v2@531.89,811.3
  Bottom Layer w8: v1(-61.27,728.68) -50.23,728.68 -48.32,730.58 34.96,730.58 37.52,728.02 v1(47.98,728.02) 58.9,728.02 60.64,729.76 483.27,729.76 531.89,778.37 531.89,798.8 532.71,799.62 532.71,808.31 v2(535.7,811.3)
RD_P: C61.1 D7.1 J1.3 R11.5 U4.6 | length 1255.5
  Top Layer w8: J1.3@-203.34,879.49 -153.91,830.05 -153.91,759.77 -145.63,751.49 -110.73,751.49 -106.05,756.17 -106.05,766.73 D7.1@-94.88,777.89 -92.91,777.89 -72.5,757.48 -64.26,757.48 v1(-61.27,754.49) ; v1(48.21,753.83) 86,753.83 97,764.83 C61.1@97,765.5 ; R11.5@504.35,868.49 509.89,862.95 v2@509.89,811.3 ; v2(506.08,811.3) v2@509.89,811.3 ; U4.6@672.83,723.01 661.95,723.01 659.63,720.69 539.73,720.69 509.89,750.53 v2@509.89,811.3
  Bottom Layer w8: v1(-61.27,754.49) -50.58,754.49 -48.68,752.58 -38.93,752.58 -34.93,752.58 ccw(c-34.93,761.58) -25.93,761.58 -25.93,763.58 cw(c-16.93,763.58) -7.93,763.58 -7.93,761.58 ccw(c1.07,761.58) 1.07,752.58 34.96,752.58 36.21,753.83 40.99,753.83 v1(48.21,753.83) 58.68,753.83 60.75,751.76 474.16,751.76 509.89,787.49 509.89,798.8 509.07,799.62 509.07,808.31 v2(506.08,811.3)
REFIN: C41.1 U2.14 | length 138.2
  Top Layer w8: C41.1@808.59,1436.49 U2.14@808.59,1574.68
SCLK: U2.19 U3.22 | length 1863.4
  Top Layer w8: v1(798.66,1679.27) 839.08,1679.27 851.08,1667.28 U2.19@901.19,1667.28 ; v1(1199,1353.95) 1431.05,1353.95 1637,1148 1637,785 1716.51,705.49 U3.22@1801.49,705.49
  Bottom Layer w8: v1(798.66,1679.27) 1107.73,1679.27 1199,1588 v1(1199,1353.95)
TD_N: D8.1 J1.2 R11.2 R11.8 R16.1 U4.1 | length 2047.6
  Top Layer w8: J1.2@-303.34,929.49 cw(c-192.83,929.49) -192.83,1040 -120.2,1040 ccw(c-120.2,1065.32) D8.1@-94.88,1065.32 -92.91,1065.32 -80.77,1053.18 -71.5,1043.91 -58.3,1043.91 v2(-56.06,1041.67) ; v2(139,1092.19) 140.81,1094 162.81,1094 184.09,1072.72 184.09,1009.22 183.19,1008.31 v2(183.19,1002) ; R16.1@568.29,992.05 569.11,992.05 v2(569.11,964.39) 570.18,963.32 573.46,963.32 573.46,938.17 R11.2@568.92,938.17 ; R16.1@570.26,992.05 R16.1@571.57,990.73 ; v2(599.27,898.65) 599.27,870.3 597.46,868.49 R11.8@601.99,868.49 596.46,862.95 596.46,839 611.71,823.75 659.63,823.75 661.95,821.43 U4.1@672.83,821.43
  Bottom Layer w8: v2(-56.06,1041.67) -58.58,1039.16 -90,1039.16 -100,1049.16 -100,1073 -79,1094 137.19,1094 v2(139,1092.19) 140.81,1094 172,1094 285,981 552.5,981 cw(c552.5,964.39) v2(569.11,964.39) ; v2(183.19,1002) 183.19,995.69 184.09,994.78 184.09,932.46 272.56,844 576.38,844 597.27,864.89 597.27,896.65 v2(599.27,898.65)
TD_P: D8.2 J1.1 R11.1 R11.7 R15.1 U4.2 | length 2047.6
  Top Layer w8: J1.1@-203.34,979.49 cw(c-164.83,979.49) -164.83,1018 -122.36,1018 cw(c-122.36,990.52) D8.2@-94.88,990.52 -92.91,990.52 -80.77,1002.66 -80.77,1004.97 -76.09,1009.66 -59.05,1009.66 v2(-56.06,1012.64) ; v2(139,1119.81) 140.81,1118 172.75,1118 208.09,1082.66 208.09,1072.72 208.09,1068.72 ccw(c217.09,1068.72) 217.09,1059.72 218.17,1059.72 cw(c218.17,1050.72) 218.17,1041.72 217.09,1041.72 ccw(c217.09,1032.72) 208.09,1032.72 208.09,1009.22 209,1008.31 v2(209,1002) ; v2(571.28,898.65) 570.1,897.46 570.1,871.84 573.46,868.49 R11.7@568.92,868.49 574.46,862.95 574.46,829.89 602.6,801.75 U4.2@672.83,801.75 ; R15.1@601.94,992.05 599.5,992.05 v2(599.5,964.24) 599.43,964.17 598.31,964.17 597.46,963.32 597.46,938.17 R11.1@601.99,938.17
  Bottom Layer w8: v2(-56.06,1012.64) -58.58,1015.16 -99.94,1015.16 -124,1039.22 -124,1082.94 -88.94,1118 137.19,1118 v2(139,1119.81) 140.81,1118 181.94,1118 294.94,1005 558.74,1005 cw(c558.74,964.24) v2(599.5,964.24) ; v2(209,1002) 209,995.69 208.09,994.78 208.09,942.4 282.5,868 566.44,868 571.28,872.84 v2(571.28,898.65)
USB.USB_N: J2.A7 J2.B7 U3.13 | length 3650.8
  Top Layer w8: v2(-483.44,-232.99) cw(c-457.63,-232.66) -480.62,-220.93 cw(c-437.09,-220.93) -467.87,-190.15 -444.36,-166.64 J2.A7@-443.91,-166.64 ; J2.B7@-471.75,-138.8 -471.75,-138.36 -462.12,-128.72 cw(c-411.9,-178.8) v2(-411.9,-107.88) ; v2(716,1217.67) 726.69,1217.67 729.6,1214.76 1439.63,1214.76 1491.58,1162.81 1495.69,1162.81 v2(1503.25,1155.25) ; v2(1778,1249.81) 1788.69,1249.81 1791.6,1246.91 1843.08,1246.91 1885.7,1204.28 1885.7,1155.39 1886.98,1154.1 1886.98,1138.89 U3.13@1900.7,1125.17
  Bottom Layer w8: v2(-483.44,-232.99) -483.44,-221.97 -477.63,-216.16 -477.63,-136.35 -452.07,-110.79 -425.5,-110.79 -422.59,-107.88 v2(-411.9,-107.88) -401.21,-107.88 -398.3,-110.79 -313.79,-110.79 40,243 211,243 271.98,303.98 271.98,317.33 665.31,710.67 665.31,1188.31 694.67,1217.67 v2(716,1217.67) ; v2(1503.25,1155.25) 1510.81,1147.69 1510.81,1143.58 1518.03,1136.36 1559.36,1136.36 1669.91,1246.91 1764.4,1246.91 1767.31,1249.81 v2(1778,1249.81)
USB.USB_P: J2.A6 J2.B6 U3.14 | length 3650.8
  Top Layer w8: J2.A6@-457.83,-152.72 -442.26,-137.15 cw(c-424.26,-155.15) -428.72,-130.08 cw(c-427.33,-137.96) -423.74,-130.82 ccw(c-411.9,-107.88) v2(-411.9,-133.69) ; v2(-457.63,-232.66) ccw(c-483.44,-232.99) -460.62,-220.93 cw(c-437.09,-220.93) -453.73,-204.29 J2.B6@-430,-180.56 ; v2(716,1191.86) 726.69,1191.86 729.6,1194.76 1431.35,1194.76 1477.44,1148.67 1477.44,1144.56 v2(1485,1137) ; v2(1778,1224) 1788.69,1224 1791.6,1226.91 1834.79,1226.91 1865.7,1196 1865.7,1155.39 1864.42,1154.1 1864.42,1138.89 U3.14@1850.7,1125.17 U3.14@1850.7,1136.98
  Bottom Layer w8: v2(-457.63,-232.66) -457.63,-144.63 -443.79,-130.79 -425.5,-130.79 -422.59,-133.69 v2(-411.9,-133.69) -401.21,-133.69 -398.3,-130.79 -383.98,-130.79 -361.98,-130.79 cw(c-361.98,-139.79) -352.98,-139.79 -352.98,-151.79 ccw(c-343.98,-151.79) -334.98,-151.79 -334.98,-137.79 cw(c-325.98,-137.79) -316.98,-137.79 -316.98,-146.91 ccw(c-307.98,-146.91) -298.98,-146.91 -298.98,-127.99 cw(c-289.98,-127.99) -296.34,-121.63 -274,-99.28 48.28,223 219.28,223 292.61,296.32 292.61,309.68 685.31,702.38 685.31,1180.03 697.14,1191.86 v2(716,1191.86) ; v2(1485,1137) 1492.56,1129.44 1496.67,1129.44 1509.75,1116.36 1567.64,1116.36 1678.19,1226.91 1764.4,1226.91 1767.31,1224 v2(1778,1224)
VBUS: C46.1 D1.2 FB1.1 J2.A4/B9 J2.B4/A9 | length 720.5
  Top Layer w20: J2.A4/B9@-517.69,-92.87 v1(-485.67,-60.85) ; v1(-293.42,-224.73) -292.73,-224.04 -292.73,-222.47 -271.47,-201.22 C46.1@-271.47,-194.15
  Bottom Layer w20: v1(-485.67,-60.85) -552.49,-182.65 -552.49,-212.51 -400,-365 -332,-365 -261,-294 -261,-257.15 v1(-293.42,-224.73)
VDD: C51.2 C52.2 FB3.2 FB4.1 J1.11 J1.13 R20.2 R22.2 RN1.6 RN1.7 RN1.8 U4.28 | length 2026.8
  Top Layer w8: U4.28@1007.48,663.95 1045.72,663.95 1059.11,650.57 C52.2@1059.11,623.9
  Top Layer w22: 1155.2,520.49 1192.07,520.49 1223.18,520.49 1237.18,534.49 1237.18,565.6 1390.81,719.23 1390.81,1036.93 1326.28,1101.47 1260.1,1101.47
  Bottom Layer w30: J1.11@-653.34,1019.25 -513.59,1159 378,1159 v1(408,1129)
  other v1: 909.36,1134 1149,1162 1178,1162
VDDA: C54.2 C55.2 C56.2 C57.2 C58.2 C59.2 C60.2 FB4.2 R15.2 R16.2 R17.2 U4.4 U4.8 U4.11 U4.15 U4.17 U4.21 | length 1476.4
  Top Layer w8: 623.69,542.84 628.69,542.84 ; C56.2@623.69,617.15 623.69,619.58 628.69,624.58 U4.11@672.83,624.58 763.83,624.58 771.26,617.15 ; C55.2@623.69,691.64 631.69,683.64 U4.8@672.83,683.64 758.76,683.64 771.26,671.14 ; C54.2@623.69,771.68 623.69,770.38 C54.2@628.69,765.38 ; C54.2@628.69,762.38 U4.4@672.83,762.38 762.87,762.38 771.26,753.99 771.26,671.14 ; C58.2@745.27,493.84 746.56,495.13 765.09,495.13 771.26,501.3 U4.15@771.26,545.84 771.26,585.23 ; C59.2@810.63,493.84 U4.17@810.63,545.84 810.63,578.15 823.13,590.65 ; C60.2@889.37,487.13 U4.21@889.37,545.84 889.37,577.86 876.58,590.65 823.13,590.65 ; 771.26,585.23 771.26,617.15 ; 771.26,585.23 776.68,590.65 823.13,590.65 ; 771.26,617.15 771.26,671.14
  Top Layer w22: R17.2@-32.77,885.33 158.33,885.33 v1(310,1037)
  other v1: 403,1037
W5500_CS: U3.5 U4.32 | length 1697
  Top Layer w8: v1(942.13,709.62) 974.78,742.28 1007.07,742.28 U4.32@1007.48,742.69 ; v1@2299.49,978.49 v1@2300.7,979.7
  Top Layer w22: v1@2300.7,979.7 U3.5@2300.7,1125.17
  Bottom Layer w8: v1(942.13,709.62) 1067.62,709.62 1336.49,978.49 v1(2301.49,978.49)
W5500_INT: R20.1 U3.39 U4.36 | length 2144.5
  Top Layer w8: v1(954.95,834.66) 968.18,821.43 U4.36@1007.48,821.43 ; R20.1@1185.69,980.93 1185.78,981.02 v1(1226.06,981.02) ; v1@1226.06,980.93 1315.07,980.93 1358,938 v1(1358,792) ; v1(2381,521) 2428.18,521 2451,498.18 2451,436.5 U3.39@2450.7,436.2
  Bottom Layer w8: v1(954.95,834.66) 1101.22,980.93 1225.97,980.93 v1(1226.06,981.02) ; v1(1358,792) 1358,552.69 1391.69,519 2379,519 v1(2381,521)
W5500_MISO: U3.7 U4.34 | length 1572.2
  Top Layer w8: v1(920.2,769.43) 924.43,769.43 937.07,782.06 U4.34@1007.48,782.06 ; U3.7@2200.49,1124.96 U3.7@2200.7,1125.17
  Top Layer w22: v1(2200.49,1036.49) U3.7@2200.49,1124.96
  Bottom Layer w8: v1(920.2,769.43) 1076.52,769.43 1343.58,1036.49 v1(2200.49,1036.49)
W5500_MOSI: U3.12 U4.35 | length 1296.4
  Top Layer w8: v1(915.35,801.75) U4.35@1007.48,801.75
  Top Layer w22: v1(1950.7,1065.53) U3.12@1950.7,1125.17
  Bottom Layer w8: v1(915.35,801.75) 1083.38,801.75 1347.16,1065.53 v1(1950.7,1065.53)
W5500_PWR_EN: Q1.1 U3.4 | length 1236.8
  Top Layer w22: v1(1479.05,763.73) 1513.94,763.73 Q1.1@1515.9,765.69 ; v1(2350.7,1072.53) U3.4@2350.7,1125.17
  Bottom Layer w8: v1(1479.05,763.73) 2292.73,763.73 2350.7,821.7 v1(2350.7,1072.53)
W5500_RST: R22.1 U3.38 U4.37 | length 1969.1
  Top Layer w8: U4.37@948.42,880.49 950.72,882.79 950.72,900.5 964.71,914.49 1066.75,914.49 1103.47,951.21 1313.79,951.21 1331.73,933.27 v1(1331.73,765.69) ; R22.1@1133.19,980.93 R22.1@1135.69,980.93 ; v1(2398,493) 2398,438.9 U3.38@2400.7,436.2
  Bottom Layer w8: v1(1331.73,765.69) 1331.73,541.27 1380,493 v1(2398,493)
W5500_SCLK: U3.6 U4.33 | length 1624.7
  Top Layer w8: v1(935.04,741.87) 935.04,743.55 953.86,762.38 U4.33@1007.48,762.38
  Top Layer w22: v1(2250.7,1008.49) U3.6@2250.7,1125.17
  Bottom Layer w8: v1(935.04,741.87) 1074.41,741.87 1341.03,1008.49 v1(2250.7,1008.49)
pads on no net: J1.MH J2.A8 J2.B8 J2.MH J3.MP1 J3.MP2 RN1.4 RN1.5 RN2.1 RN2.2 RN2.7 RN2.8 U1.4 U2.27 U3.9 U3.10 U3.11 U3.15 U3.16 U3.24 U3.25 U3.26 U3.28 U3.29 U3.30 U3.31 U3.32 U3.33 U3.34 U3.35 U4.7 U4.12 U4.13 U4.18 U4.24 U4.26 U4.46 U4.47 U6.7

## Polygon pours and split planes (outlines as drawn)
GND on Bottom Layer "Bottom Layer-No Net" (solid, remove dead copper, pour order 5): -942.17,45.65 -942.17,1513.33 45.64,2501.14 1513.33,2501.14 2501.14,1513.33 2501.14,45.65 1513.33,-942.17 45.64,-942.17
GND on Top Layer "Top Layer-No Net" (solid, remove dead copper, pour order 4): -942.17,45.65 -942.17,1513.33 45.64,2501.14 1513.33,2501.14 2501.14,1513.33 2501.14,45.65 1513.33,-942.17 45.64,-942.17

## Other copper
Top Layer:
  rectangle net POE_PWR_P: 216.49,89.49 551.52,269.7
  rectangle net POE_PWR_P: 258,249 290,678.82
  rectangle net VDDA: 391,1037 614.16,1049
  rectangle net 3V3: 945.5,1460.49 1080.5,1489
  rectangle net 3V3: 824.35,1485 1317,1521.49
  rectangle net 3V3: 727,-669.39 781.94,-580
  region net GND: -303.91,-57.94 -333.87,-27.98 -394.79,-88.9 -364.83,-118.86
  rectangle net POE_PWR_P: -249,451.79 44,614.92
  rectangle net NetC39_2: 1108.59,1588.99 1144.73,1656.49
  rectangle net NetC39_2: 1090.56,1638.99 1144.73,1754.05
  rectangle net VDDA: 806.63,484.84 832.13,511.78
  rectangle net VDDA: 614.69,677.34 638.69,704.14
  rectangle net GND: 917.35,476.5 944.13,502.84
  rectangle net GND: 434.41,565.65 595.69,617.15
  rectangle net VDDA: 391,595 424,1049
  rectangle net VDDA: 434.41,521.83 638.69,551
  rectangle net \R\E\S\E\T\: 848.04,1534 980.5,1606.25
  rectangle net GND: 552.49,758.85 595.69,784.48
  region net VDDA: 638.69,784.18 614.81,784.18 614.81,758.38 638.69,758.38
  rectangle net VDDA: 885,356.49 903,501.5
  rectangle net VDDA: 885,356.49 1150.92,434.5
  rectangle net GND: 1118.95,718.99 1166.2,797.99
  rectangle net VDD: 1118.19,1025.93 1402,1177
  rectangle net VDD: 742,1116 924.2,1150
  rectangle net VDD: 391,1065 756.85,1150
  rectangle net VDD: 391,1065 756.85,1101
  region net GND: 2386.23,1663.78 2143.75,1906.26 2112.43,1874.94 2354.92,1632.46
  region net 3V3: 1318.45,2205.73 1170.32,2267.08 1153.93,2227.52 1302.06,2166.16
  region net VDDA: 614.16,1049 561.01,1049 561.01,1008.39 614.16,1008.39
  rectangle net CT_R: 491.56,1008.39 544.71,1019.02
  rectangle net GND: 2495.57,1189.27 2543.42,1337.06
  rectangle net GND: 2480.98,406.67 2518.42,1337.06
  rectangle net 3V3: 2420.57,1189.27 2468.42,1368.51
  rectangle net 3V3: 2432.98,1095.65 2468.42,1337.06
  rectangle net VDD: -685,464.67 -628.29,1043.46
  region net "DEBUG SIG.ENABLE": 2343.08,1617.15 2131.63,1828.61 2062.42,1759.4 2273.88,1547.95
  rectangle net W5500_RST: 1118.19,947.21 1153.19,991.93
  region net 3V3: 164.87,2172.82 51.64,2125.92 83.19,2049.75 196.42,2096.65
  rectangle net 3V3: 632.52,-670 740.57,-257.78
  rectangle net 5V: -58.5,-637.5 89.5,-272.5
  rectangle net 5V: 890.18,-636.26 929.55,-561.76
  rectangle net CT_T: -145.63,867.83 -77.77,941.99
  rectangle net GND: 948.59,1906.49 1008.59,1981.49
  rectangle net GND: 818.45,1966.49 1008.59,1996.49
  rectangle net 3V3: 836.62,1870.35 926.09,1936.49
  rectangle net GND: 1090.56,1785.54 1144.73,1898.99
  rectangle net ADC1_XOUT#: 1030.56,1785.54 1078.59,1898.99
  rectangle net GND: 1030.56,1638.99 1080.5,1754.05
  rectangle net 3V3: 1515.5,335 1557.49,607
  region net NetQ1_3: 1497.64,618.5 1497.64,703.1 1460.24,703.1 1460.24,618.5
  rectangle net NetC49_1: 1406.63,468.86 1497.49,594.6
  rectangle net VDD: 669.05,1039.32 756.85,1101
  rectangle net GND: 822.57,1039.12 1031.2,1093
  region net 3V3: -639.07,146.1 -593.15,26.47 -539.7,46.99 -585.62,166.62
  region net 3V3: -634.86,1356.89 -680.44,1244.1 -643.69,1229.25 -598.12,1342.04
  region net 3V3: 2112.03,1545.44 2072.25,1528.96 2127.7,1395.08 2167.48,1411.56
  region net 3V3: 2157.35,248.63 2206.98,228.07 2258.34,352.06 2208.71,372.62
  region net 3V3: 1368.21,-573.12 1389.1,-617.91 1518.07,-557.77 1497.19,-512.98
  region net 3V3: 235.87,-604.24 219.95,-643.64 348.13,-695.42 364.05,-656.03
  region net GPIO21: -311.77,-541.36 -194.11,-423.7 -242.06,-375.75 -359.72,-493.41
  region net GND: -303.78,-204.25 -317.42,-190.61 -339.07,-212.27 -325.44,-225.9
  region net VBUS: -288.3,-141.33 -300.13,-129.5 -406.3,-235.67 -394.46,-247.5
  region net VBUS: -242.87,-186.76 -298.13,-131.5 -329.08,-162.45 -273.82,-217.71
  region net 5V_USB: -127.05,-161.51 -228.82,-59.74 -292.05,-122.97 -190.28,-224.74
  region net 5V: -142.69,-258.07 -19.38,-381.38 89.5,-272.5 -33.81,-149.19
  rectangle net POE_PWR_N: 172.92,527.51 239,614.92
  rectangle net POE_PWR_P: 39,527.51 138.49,614.92
  rectangle net POE_PWR_N: 60,376 93.3,495
  rectangle net POE_PWR_N: -102.45,302.79 93.3,434
  rectangle net GND: 956.56,-588.32 991.56,-526.51
  rectangle net GND: 890.18,-547.91 991.56,-525.91
  rectangle net 3V3: 348,-937 781.94,-652
  rectangle net NetFB2_1: 795.69,-636.26 837.06,-560.76
  rectangle net GND: 752.27,-372.1 923.02,-75.01
  rectangle net GND: 752.27,-372.1 868.69,-57.51
  rectangle net GND: 301.8,-269.26 455.46,-20.51
  rectangle net GND: 301.8,-27.42 499.33,75.52
  rectangle net POE_PWR_P: 511.52,-27.49 551.52,259.7
  rectangle net 5V: 890.18,-512.98 1159.96,-430
  rectangle net POE_5V: 1219.02,-512.98 1317.44,-290.05
  rectangle net NetC72_2: 1019.52,-414 1200.17,-106.49
  rectangle net NetC69_1: 815.49,23.49 1160.49,129.59
  rectangle net NetC69_1: 625.7,-33.1 690.69,33.54
  region net NetC69_1: 846.76,129.59 678.19,129.59 678.19,-42.1 846.76,-42.1
  rectangle net NetC69_2: 678.19,-106.87 703.19,-61.1
  region net GND: 595.69,629.65 571.69,629.65 571.69,565.65 595.69,565.65
  rectangle net VDDA: 614.69,521.83 638.69,629.65
  rectangle net NetC50_2: 1164.17,356.49 1497.49,434.5
  rectangle net VDD: 1035.61,495.49 1274.8,545.49
  rectangle net VDD: 1046.11,495.49 1076.11,637.23
  rectangle net NetC74_2: 888.02,-56.01 923.02,6.02
  rectangle net NetC72_2: 415.49,-381.83 455.46,-282.49
  rectangle net FB: 466.49,-351.3 508.99,-179.06
  region net GND: 1276.49,937.21 1178.95,937.21 1178.95,815.06 1276.49,815.06
  rectangle net NetC68_2: 1127.57,828.48 1166.2,937.21
  rectangle net NetC68_2: 1062.69,828.48 1166.2,883.6
  rectangle net NetR29_2: 1063.83,738.38 1099.42,815.06
  rectangle net NetC67_2: 1181.94,677.34 1229.19,797.99
  rectangle net NetC67_2: 1063.78,677.34 1229.19,708.38
  pour cut-out: -992.17,1118.46 -124.46,1118.46 -123,1117 -123,391 -992.17,391 -992.17,1117.52
  region net VDDA: 391,521.83 391,617.15 424,617.15 424,551 447,551 447,521.83
Bottom Layer:
  rectangle net VDDA: 297,1025 420,1059
  rectangle net 3V3: -228.08,-366 -117,-333.59
  rectangle net 3V3: -187,-362 -117,-76
  rectangle net VDD: 892,1141 1206,1176
  rectangle net VDD: 892,1116 922,1176
  rectangle net POE_PWR_N: 58,576 241,615
  rectangle net 3V3: 1372,569 1557,617
  rectangle net 5V: 890,-535 1006,-424
  rectangle net 5V: -59,-638 934,-459
  rectangle net POE_PWR_N: 58,342 124,615
  rectangle net NetR41_1: 498,-155.51 629.49,-48.51
  pour cut-out: -992.17,1118.46 -124.46,1118.46 -123,1117 -123,391 -992.17,391 -992.17,1117.52

## Silkscreen, mask and mechanical layers (free items; w line width, h text height)
Top Overlay:
  lines w8: 365.51,1677.49 507.09,1677.49 ; 366.51,1757.49 508.09,1757.49 ; 558.19,486.34 558.19,614.58 569.43,614.58 ; 740,421 756.27,421 779.62,444.34 794.63,444.34 ; 1102.33,677.38 1162.62,677.38 1175,665 1249.49,665 ; 2255.94,1248.56 2270.52,1233.99 2402.59,1233.99
  lines w10: 585.05,2312.71 585.05,2542.71 978.75,2542.71 978.75,2312.71 585.05,2312.71
  text "DEBUG" at 580.43,2274.84 h40
  text "USB" at -550.15,-17.85 h40 r315
  text "Sound_Sensor_PoE_v1.0" at 458,-967 h60
Bottom Overlay:
  drawing of 16 lines, arcs and shapes, not listed
  text "ZERO CARBON FOOTPRINT" at 1214.97,-145.51 h60
BOARD OUTLINE:
  lines w10: 1513.33,-992.17 2551.14,45.64 ; 1513.33,-992.17 45.64,-992.17 -992.17,45.64 -992.17,1513.33 45.64,2551.14 1513.33,2551.14 2551.14,1513.33 2551.14,45.64 ; 1513.33,-992.17 2551.14,45.64
FABRICATION:
  circle w0.25: c686.84,775.23 r0.12
  circle w0.5: c0,0 r49.21
  circle w0.5: c-0.78,1558.19 r49.21
  circle w0.25: c779.49,779.49 r0.12
  circle w0.5: c1558.19,1559.76 r49.21
  circle w0.25: c2514.97,779.49 r0.12
  circle w0.5: c1558.98,0 r49.21
  lines w0.5: -969.07,494.36 -969.07,1064.61 cw(c779.49,779.49) -992.17,779.49 ; -501.1,-501.1 823.16,823.16 1371.67,2151.15 1358.82,2182.1 ; -473.26,-473.26 779.49,779.49 ; -473.26,2032.24 779.49,779.49 ; -368.4,1676.32 779.49,779.49 ; -295.12,1854.1 779.49,779.49 ; -236.63,-929.37 786.99,-141.97 ; -215.64,2100.07 779.49,779.49 ; 0,0 779.49,779.49 ; 778.25,2007.32 779.49,779.49 ; 778.49,759.49 2067.34,-531.96 ; 779.49,-893.87 779.49,779.49 ; 779.49,2354.29 779.49,779.49 ; 779.49,2580.46 779.49,779.49 ; 1402.47,2437.99 1371.05,2354.33 ; 1513.33,2551.14 779.49,779.49 ; 1558.19,1559.76 779.49,779.49 ; 1955.95,1958.32 779.49,779.49 ; 2180.93,197.34 779.49,779.49 ; 2540.81,970.55 779.49,779.49 ; 2551.14,779.49 -992.17,779.49 ; -992.17,779.49 779.49,779.49 ; 1371.05,2354.33 1471.7,2312.76 1409.14,2161.31 1308.49,2202.88 1371.05,2354.33 ; -992.17,425.16 -992.17,1133.82 -126.02,1133.82 -126.02,425.16 -992.17,425.16 ; -795.36,187.93 -753.78,87.28 -602.34,149.83 -643.91,250.48 -795.36,187.93 ; -795.36,1371.05 -643.91,1308.49 -602.34,1409.14 -753.78,1471.7 -795.36,1371.05 ; -725.67,-171.64 -477.48,22.27 -259.33,-256.95 -507.52,-450.86 -725.67,-171.64 ; -725.67,1730.62 -477.48,1536.71 -259.33,1815.93 -507.52,2009.83 -725.67,1730.62 ; -394.78,-547.15 -227.95,-719.91 -132.23,-627.47 -299.05,-454.71 -394.78,-547.15 ; -394.78,2106.13 -299.05,2013.69 -132.23,2186.44 -227.95,2278.88 -394.78,2106.13 ; 87.28,-753.79 149.83,-602.34 250.48,-643.91 187.93,-795.36 87.28,-753.79 ; 87.28,2312.76 187.93,2354.33 250.48,2202.88 149.83,2161.31 87.28,2312.76 ; 1308.49,-643.91 1371.05,-795.36 1471.7,-753.79 1409.14,-602.34 1308.49,-643.91 ; 2160.04,147.06 2311.37,84.2 2353.14,184.77 2201.82,247.62 2160.04,147.06 ; 2160.04,1411.92 2201.82,1311.35 2353.14,1374.21 2311.37,1474.78 2160.04,1411.92